# Altium PCB PCB1.PcbDoc
Units mil, origin at the board's own origin, x right, y up, seen from the top; angles counter-clockwise.
Board outline 6000 x 4000 mil, 2 copper layers (Top Layer, Bottom Layer); 46 components, 64 nets, 314 pads, 0 vias.
Unrouted connection lines stored in the file: 129.
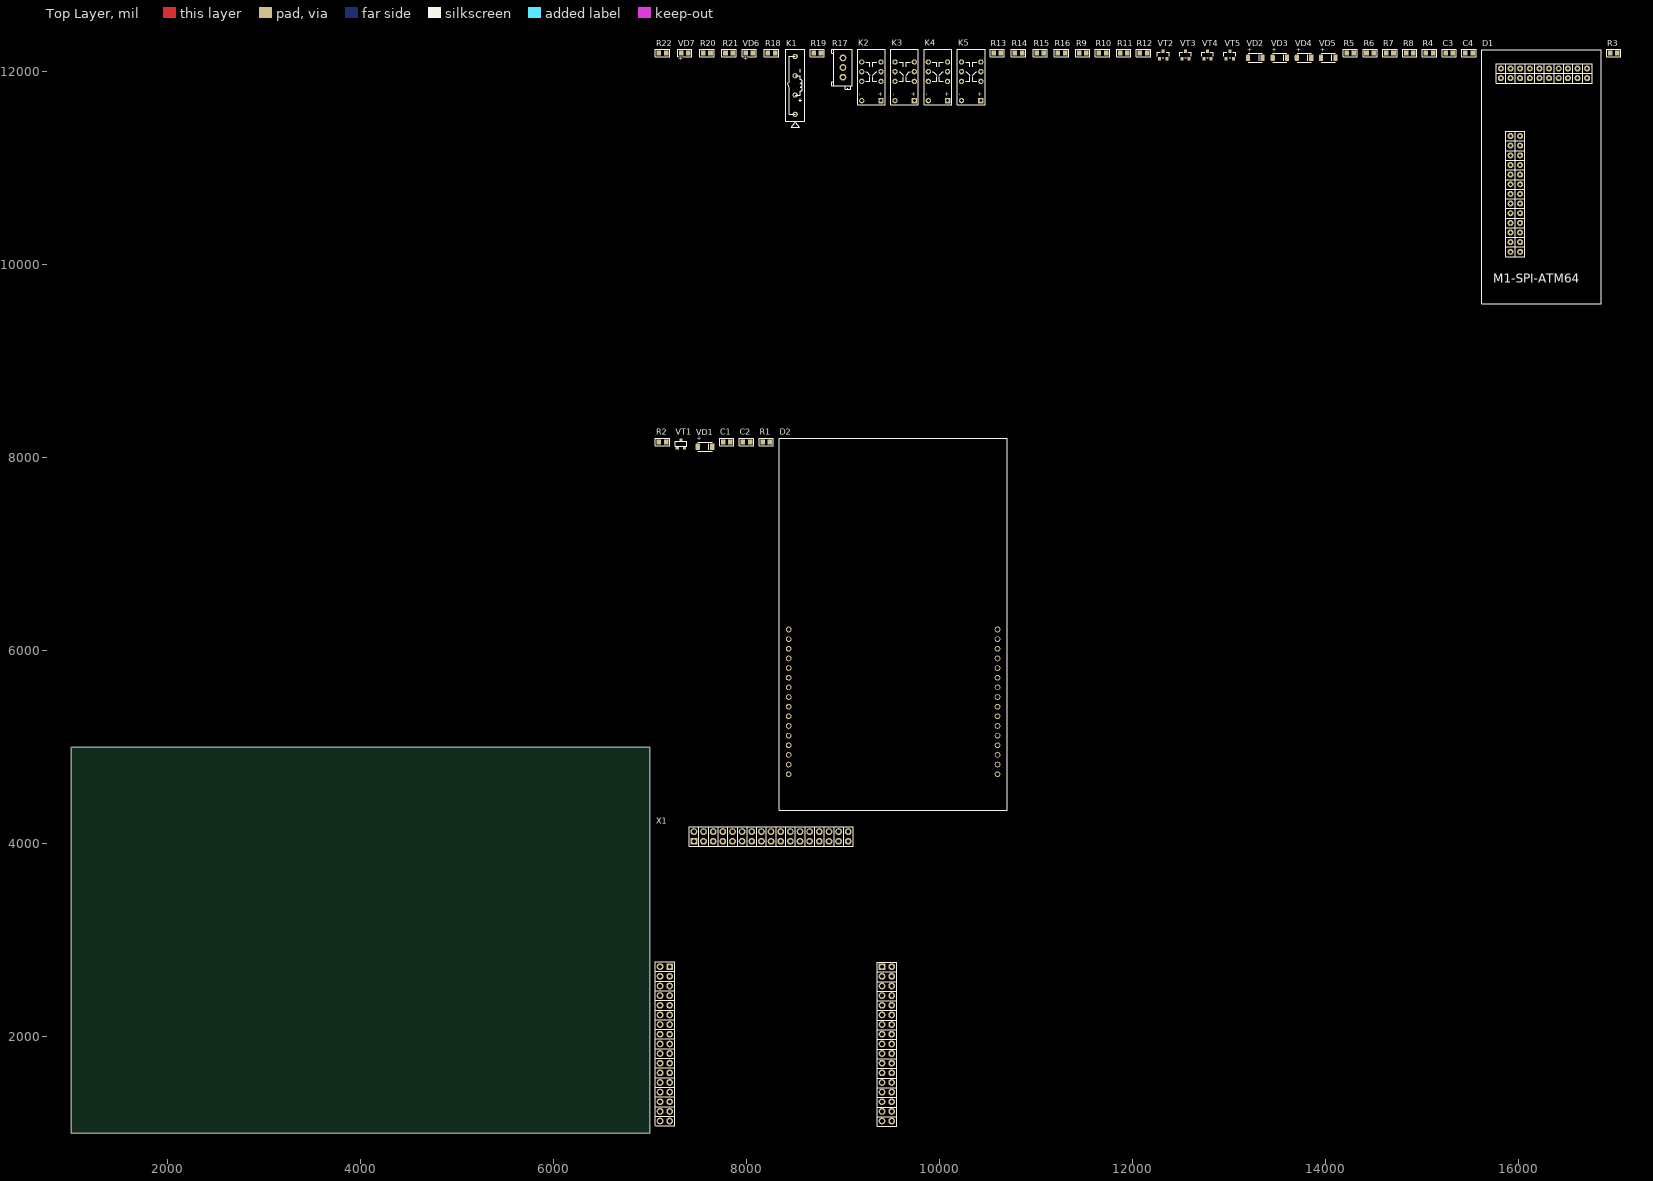
[diagram p0: Top Layer view]
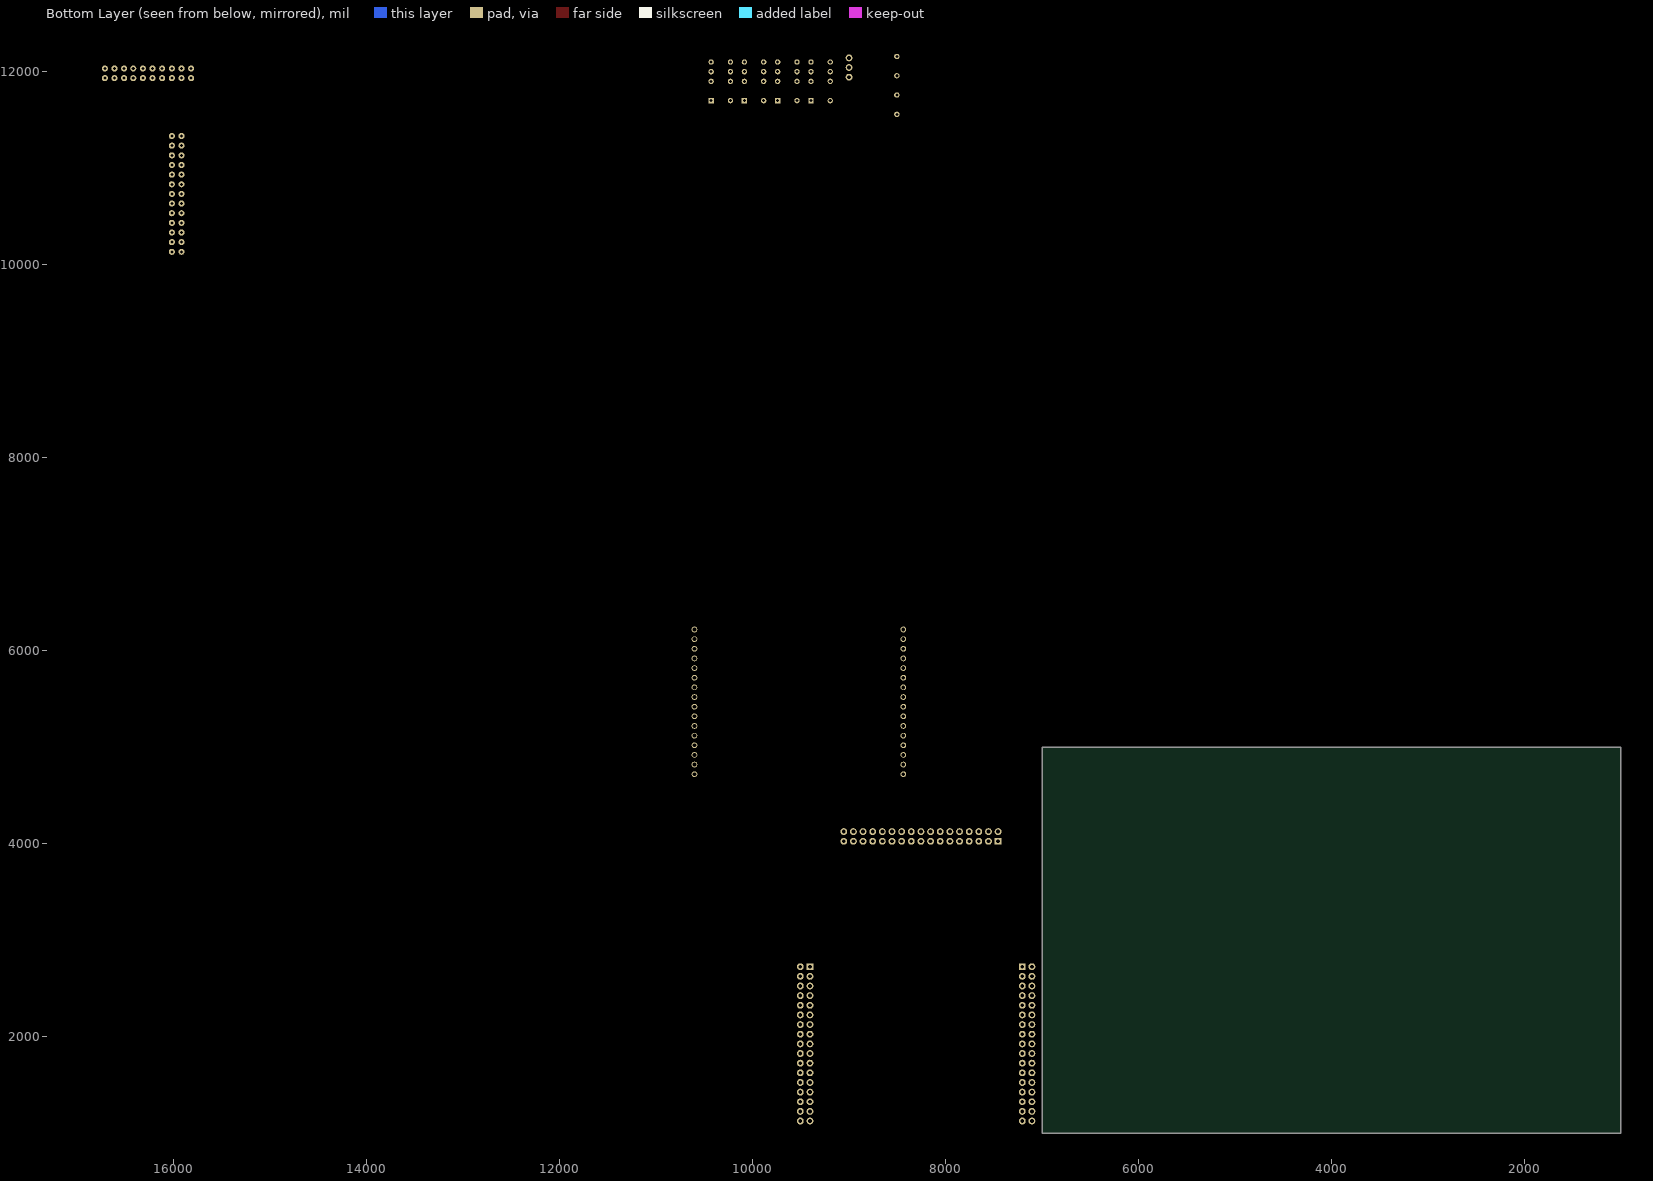
[diagram p1: Bottom Layer view, seen from below]

## Layer stack, top to bottom
Top Solder: solder mask 0.4, Solder Resist, Dk 3.5
Top Layer: signal copper 1.4
Dielectric 1: dielectric 12.6, FR-4, Dk 4.8
Bottom Layer: signal copper 1.4
Bottom Solder: solder mask 0.4, Solder Resist, Dk 3.5

## Board outline
1000,1000 7000,1000 7000,5000 1000,5000

## Design rules (kind name [scope] priority, off if disabled: settings)
Clearance [All] p1: gap=10 ignorepadtopadclearanceinfootprint=FALSE except(0: Arc-Hole Track-Hole SMDPad-Hole THPad-Hole Via-Hole Fill-Hole Poly-Hole Region-Hole Text-Hole)
PolygonConnect [All] p1: connectstyle=Relief reliefconductorwidth=10 reliefentries=4 polygonreliefangle="90 Angle" airgapwidth=10
RoutingVias [All] p1: holewidth=28 width=50 viastyle="Through Hole" minholewidth=28 minwidth=50 maxholewidth=28 maxwidth=50
SolderMaskExpansion [All] p1: expansion=4 istentingtop=FALSE
Width [All] p1: maxlimit=10 minlimit=10 preferedwidth=10
30 further rules are at their usual default settings.

## Classes and differential pairs
net class X1_Nets: +5V_CONST +5V_VCC +5V_VDD DB0_F DB1_F DB2_F DB3_F DB4_F DB5_F DB6_F DB7_F DI1_MC DO1_MC DO2_MC GND NetX1_9 NetX1_10 NetX1_11 NetX1_12 NetX1_13 NetX1_14 NetX1_15 NetX1_16 NetX1_17 NetX1_18 NetX1_19 NetX1_20 NetX1_21 NetX1_22 NetX1_23 NetX1_24 NetX1_25 NetX1_26 NetX1_27 NetX1_28 NetX1_29 NetX1_30 NetX1_31 NetX1_32 NetX1_33 NetX1_34 NetX1_35 NetX1_36 NetX1_37 NetX1_38 NetX1_39 NetX1_40 NetX1_41 NetX1_42 NetX1_43 NetX1_44 NetX1_45 NetX1_46 NetX1_47 NetX1_48 NetX1_49 NetX1_50 NetX1_51 NetX1_52 NetX1_53 NetX1_54 NetX1_55 NetX1_56 NetX1_57 NetX1_58 NetX1_59 NetX1_60 NetX1_61 NetX1_62 NetX1_63 NetX1_64 NetX1_+12V NetX1_-12V NetX1_GND NetX1_IN-OUT2 NetX1_IN-OUT3 NetX1_IN-OUT4 NetX1_IN-OUT5 NetX1_IN-OUT6 NetX1_IN-OUT7 NetX1_IN-OUT8 NetX1_NC NetX1_OUT4 NetX1_OUT5 NetX1_OUT6 NetX1_OUT7 NetX1_OUT8 NetX1_VDDF NetX1_VDDS NetX1_VEEF NetX1_VEES RST_IN
net class VT5_Nets: GND NetK5_12 NetR12_2
net class VT4_Nets: GND NetK4_12 NetR11_2
net class VT3_Nets: GND NetK3_12 NetR10_2
net class VT2_Nets: GND NetK2_12 NetR9_2
net class VT1_Nets: NetK1_5 NetR2_2 NetR4_2
net class VD7_Nets: GND NetR20_2
net class VD6_Nets: GND NetR18_2
net class VD5_Nets: NetK5_1 NetK5_12
net class VD4_Nets: NetK4_1 NetK4_12
net class VD3_Nets: NetK3_1 NetK3_12
net class VD2_Nets: NetK2_1 NetK2_12
net class VD1_Nets: +5V_CONST NetK1_5
net class R22_Nets: DO1_MC GND
net class R21_Nets: DO2_MC GND
net class R20_Nets: LED2 NetR20_2
net class R19_Nets: RST_IN RST_MC
net class R18_Nets: LED1 NetR18_2
net class R17_Nets: GND NetK1_1
net class R16_Nets: GND NetR12_2
net class R15_Nets: GND NetR11_2
net class R14_Nets: GND NetR10_2
net class R13_Nets: GND NetR9_2
net class R12_Nets: NetR12_2 ON_RELE4
net class R11_Nets: NetR11_2 ON_RELE3
net class R10_Nets: NetR10_2 ON_RELE2
net class R9_Nets: NetR9_2 ON_RELE1
net class R8_Nets: +5V_CONST NetK5_1
net class R7_Nets: +5V_CONST NetK4_1
net class R6_Nets: +5V_CONST NetK3_1
net class R5_Nets: +5V_CONST NetK2_1
net class R4_Nets: GND NetR4_2
net class R3_Nets: +5V_VDD VDD_MC
net class R2_Nets: NetR2_2 ON_RELE5
net class R1_Nets: +5V_VCC VCC_MT
net class K5_Nets: DB6 DB6_F DB6_MC DB7 DB7_F DB7_MC NetK5_1 NetK5_12
net class K4_Nets: DB4 DB4_F DB4_MC DB5 DB5_F DB5_MC NetK4_1 NetK4_12
net class K3_Nets: DB2 DB2_F DB2_MC DB3 DB3_F DB3_MC NetK3_1 NetK3_12
net class K2_Nets: DB0 DB0_F DB0_MC DB1 DB1_F DB1_MC NetK2_1 NetK2_12
net class K1_Nets: +5V_CONST NetK1_1 NetK1_5 U0
net class D2_Nets: +5V_VDD A0 DB0 DB1 DB2 DB3 DB4 DB5 DB6 DB7 ENABLE GND NetD2_17 NetD2_18 NetD2_19 NetD2_20 NetD2_21 NetD2_22 NetD2_23 NetD2_24 NetD2_25 NetD2_26 NetD2_27 NetD2_28 NetD2_29 NetD2_30 NetD2_31 R/W U0 VCC_MT
net class D1_Nets: A0 DB0_MC DB1_MC DB2_MC DB3_MC DB4_MC DB5_MC DB6_MC DB7_MC DI1_MC DO1_MC DO2_MC ENABLE GND LED1 LED2 NetD1_1 NetD1_2 NetD1_4 NetD1_5 NetD1_6 NetD1_9 NetD1_10 NetD1_11 NetD1_12 NetD1_14 NetD1_16 NetD1_18 NetD1_21 NetD1_22 NetD1_23 NetD1_24 ON_RELE1 ON_RELE2 ON_RELE3 ON_RELE4 ON_RELE5 R/W RST_MC VDD_MC
net class C4_Nets: GND VDD_MC
net class C3_Nets: GND VDD_MC
net class C2_Nets: GND VCC_MT
net class C1_Nets: GND VCC_MT
component class "Formula connector": X1

## Components (designator, comment, footprint, x,y, rotation, side; value= is the part's Value field where it differs from the comment)
C1 "47uF" 0805 7795,8165 r0 top
C2 "0.1uF" 0805 8000,8165 r0 top
C3 "10uF" 0805 15285,12195 r0 top
C4 "0.1uF" 0805 15490,12195 r0 top
D1 "M1-SPI-ATM64" M1-SPI-ATM64 15920,11935 r0 top
D2 "MT-20S4A" MT-20S4A 9520,6275 r90 top
K1 "TRR1A05F00" TRR1A05F00 8505,11860 r90 top
K2 "V23079A1001B301 TE" V23079A1001B301 9295,11950 r90 top
K3 "V23079A1001B301 TE" V23079A1001B301 9640,11950 r90 top
K4 "V23079A1001B301 TE" V23079A1001B301 9985,11950 r90 top
K5 "V23079A1001B301 TE" V23079A1001B301 10330,11950 r90 top
R1 "0" 0805 8205,8165 r0 top
R2 "33k" 0805 7130,8165 r0 top
R3 "1" 0805 16990,12195 r0 top
R4 "0" 0805 15080,12195 r0 top
R5 "R0805 Yageo" 0805 14260,12195 r0 top value=10
R6 "R0805 Yageo" 0805 14465,12195 r0 top value=10
R7 "R0805 Yageo" 0805 14670,12195 r0 top value=10
R8 "R0805 Yageo" 0805 14875,12195 r0 top value=10
R9 "R0805 Yageo" 0805 11485,12195 r0 top value=4.7k
R10 "R0805 Yageo" 0805 11690,12195 r0 top value=4.7k
R11 "R0805 Yageo" 0805 11910,12195 r0 top value=4.7k
R12 "R0805 Yageo" 0805 12115,12195 r0 top value=4.7k
R13 "R0805 Yageo" 0805 10600,12195 r0 top value=20k
R14 "R0805 Yageo" 0805 10820,12195 r0 top value=20k
R15 "R0805 Yageo" 0805 11045,12195 r0 top value=20k
R16 "R0805 Yageo" 0805 11265,12195 r0 top value=20k
R17 "3296X-1-503LF" 3296X-1-503LF 9000,12045 r90 top value=10k
R18 "R0805 Yageo" 0805 8260,12195 r0 top value=2.2k
R19 "100" 0805 8735,12195 r0 top
R20 "R0805 Yageo" 0805 7590,12195 r0 top value=2.2k
R21 "10k" 0805 7820,12195 r0 top
R22 "10k" 0805 7130,12195 r0 top
VD1 "LL4148" SOD80C 7570,8115 r0 top
VD2 "LL4148 NXP" SOD80C 13275,12145 r0 top
VD3 "LL4148 NXP" SOD80C 13530,12145 r0 top
VD4 "LL4148 NXP" SOD80C 13780,12145 r0 top
VD5 "LL4148 NXP" SOD80C 14030,12145 r0 top
VD6 "LED(0805)" 0805(LED) 8030,12195 r0 top
VD7 "LED(0805)" 0805(LED) 7360,12195 r0 top
VT1 "BC817" SOT-23#1 7320,8145 r0 top
VT2 "MMBT5551L" SOT-23#2 12320,12175 r0 top
VT3 "MMBT5551L" SOT-23#2 12550,12175 r0 top
VT4 "MMBT5551L" SOT-23#2 12780,12175 r0 top
VT5 "MMBT5551L" SOT-23#2 13010,12175 r0 top
X1 "FORMULA" FORMULA 8355,2245 r90 top

## Footprints (in the part's own frame and the unit in brackets; to place one, negate y for a bottom-side part, rotate by r counter-clockwise, add the part's x,y. Pads: shape width x height; smd on the part's side, far side on the other; paste and mask are expansions set on the pad)
0805 [mm]
  rect 1.2x1.3 smd: 1(-0.95,0) 2(0.95,0)
  silkscreen extent -1.87,-0.97 1.87,0.97, body extent -1.05,-0.63 0.95,0.63, height 0.55
0805(LED) [mm]
  rect 1.2x1.3 smd: 1(-0.95,0) 2(0.95,0)
  silkscreen extent -1.87,-0.97 1.87,0.97, body extent -1.03,-0.41 1.03,0.5, height 0.85
3296X-1-503LF [mm]
  round 1.8 hole 1: 1(2.54,0) 2(0,0) 3(-2.54,0)
  silkscreen extent -5.77,-2.45 4.76,2.95, body extent -6.34,-2.45 4.74,2.38, height 9.98
FORMULA [mm]
  rect 1.8x1.8 hole 1: 1(12.18,29.22) VDDF(12.18,-26.68) VEEF(45.2,22.86)
  round 1.8 hole 1: 2(9.64,29.22) 3(7.1,29.22) 4(4.56,29.22) 5(2.02,29.22) 6(-0.52,29.22) 7(-3.06,29.22) 8(-5.6,29.22) 9(-8.14,29.22) 10(-10.68,29.22) 11(-13.22,29.22) 12(-15.76,29.22) 13(-18.3,29.22) 14(-20.84,29.22) 15(-23.38,29.22) 16(-25.92,29.22) 17(12.18,31.76) 18(9.64,31.76) 19(7.1,31.76) 20(4.56,31.76) 21(2.02,31.76) 22(-0.52,31.76) 23(-3.06,31.76) 24(-5.6,31.76) 25(-8.14,31.76) 26(-10.68,31.76) 27(-13.22,31.76) 28(-15.76,31.76) 29(-18.3,31.76) 30(-20.84,31.76) 31(-23.38,31.76) 32(-25.92,31.76) 33(-28.46,-29.22) 34(-25.92,-29.22) 35(-23.38,-29.22) 36(-20.84,-29.22) 37(-18.3,-29.22) 38(-15.76,-29.22) 39(-13.22,-29.22) 40(-10.68,-29.22) 41(-8.14,-29.22) 42(-5.6,-29.22) 43(-3.06,-29.22) 44(-0.52,-29.22) 45(2.02,-29.22) 46(4.56,-29.22) 47(7.1,-29.22) 48(9.64,-29.22) 49(-28.46,-26.68) 50(-25.92,-26.68) 51(-23.38,-26.68) 52(-20.84,-26.68) 53(-18.3,-26.68) 54(-15.76,-26.68) 55(-13.22,-26.68) 56(-10.68,-26.68) 57(-8.14,-26.68) 58(-5.6,-26.68) 59(-3.06,-26.68) 60(-0.52,-26.68) 61(2.02,-26.68) 62(4.56,-26.68) 63(7.1,-26.68) 64(9.64,-26.68) +5V(45.2,-15.24) +5V(47.74,-15.24) +5V_VCCF(45.2,20.32) +5V_VCCS(47.74,20.32) +5V_VDDF(45.2,17.78) +5V_VDDS(47.74,17.78) +12V(45.2,-12.7) +12V(47.74,-12.7) -12V(45.2,-17.78) -12V(47.74,-17.78) GND(-28.46,29.22) GND(-28.46,31.76) GND(45.2,-10.16) GND(45.2,15.24) GND(47.74,-10.16) GND(47.74,15.24) IN-OUT1(47.74,10.16) IN-OUT2(47.74,7.62) IN-OUT3(47.74,5.08) IN-OUT4(47.74,2.54) IN-OUT5(47.74,0) IN-OUT6(47.74,-2.54) IN-OUT7(47.74,-5.08) IN-OUT8(47.74,-7.62) NC(45.2,12.7) NC(47.74,12.7) OUT1(45.2,10.16) OUT2(45.2,7.62) OUT3(45.2,5.08) OUT4(45.2,2.54) OUT5(45.2,0) OUT6(45.2,-2.54) OUT7(45.2,-5.08) OUT8(45.2,-7.62) VDDS(12.18,-29.22) VEES(47.74,22.86)
  silkscreen extent -29.8,-30.51 49.02,32.97, body extent -29.79,-30.4 48.98,32.92, height 3
M1-SPI-ATM64 [mm]
  round 1.6 hole 0.8: 1(-2.54,2.54) 2(-2.54,0) 3(0,2.54) 4(0,0) 5(2.54,2.54) 6(2.54,0) 7(5.08,2.54) 8(5.08,0) 9(7.62,2.54) 10(7.62,0) 11(10.16,2.54) 12(10.16,0) 13(12.7,2.54) 14(12.7,0) 15(15.11,2.54) 16(15.11,0) 17(17.65,2.54) 18(17.65,0) 19(20.19,2.54) 20(20.19,0) 21(0,-15.24) 22(2.54,-15.24) 23(0,-17.78) 24(2.54,-17.78) 25(0,-20.32) 26(2.54,-20.32) 27(0,-22.86) 28(2.54,-22.86) 29(0,-25.4) 30(2.54,-25.4) 31(0,-27.94) 32(2.54,-27.94) 33(0,-30.48) 34(2.54,-30.48) 35(0,-33.02) 36(2.54,-33.02) 37(0,-35.56) 38(2.54,-35.56) 39(0,-38.1) 40(2.54,-38.1) 41(0,-40.64) 42(2.54,-40.64) 43(0,-43.18) 44(2.54,-43.18) 45(0,-45.72) 46(2.54,-45.72)
  silkscreen extent -7.54,-59.46 23.9,7.54, body extent -4.06,-47.27 21.84,3.7, height 8.5
MT-20S4A [mm]
  round 1.5 hole 1: 1(-39.5,27.5) 2(-36.96,27.5) 3(-34.42,27.5) 4(-31.88,27.5) 5(-29.34,27.5) 6(-26.8,27.5) 7(-24.26,27.5) 8(-21.72,27.5) 9(-19.18,27.5) 10(-16.64,27.5) 11(-14.1,27.5) 12(-11.56,27.5) 13(-9.02,27.5) 14(-6.48,27.5) 15(-3.94,27.5) 16(-1.4,27.5) 17(-39.5,-27.5) 18(-36.96,-27.5) 19(-34.42,-27.5) 20(-31.88,-27.5) 21(-29.34,-27.5) 22(-26.8,-27.5) 23(-24.26,-27.5) 24(-21.72,-27.5) 25(-19.18,-27.5) 26(-16.64,-27.5) 27(-14.1,-27.5) 28(-11.56,-27.5) 29(-9.02,-27.5) 30(-6.48,-27.5) 31(-3.94,-27.5) 32(-1.4,-27.5)
  round 0 hole 3.5: 2(-46.5,-27.5) 2(-46.5,27.5) 2(46.5,-27.5) 2(46.5,27.5)
  silkscreen extent -49,-30 49,30, body extent -40.43,-28.43 -0.52,28.46, height 9.6
SOD80C [mm]
  rrect50% 1.1x1.7 smd: 1(-1.9,0)
  rect 1.1x1.7 smd: 2(1.9,0)
  silkscreen extent -1.85,-1.17 1.85,1.17, body extent -1.9,-0.8 1.8,0.8, height 1.55
SOT-23#1 [mm]
  rect 0.8x0.9 smd: 1(-0.95,-1) 2(0.95,-1) 3(0,1)
  silkscreen extent -1.5,-0.7 1.5,0.7, body extent -1.5,-1.15 1.5,1.15, height 1.09
SOT-23#2 [mm]
  rect 0.8x0.9 smd: 1(-0.95,-1) 1(-0.95,-1) 2(0.95,-1) 2(0.95,-1) 3(0,1) 3(0,1)
  silkscreen extent -1.55,-0.72 1.55,0.7, body extent -1.5,-1.25 1.5,1.25, height 1.05
TRR1A05F00 [mm]
  round 1.4 hole 0.8: 1(-7.62,0) 3(-2.54,0) 5(2.54,0) 7(7.62,0)
  silkscreen extent -11,-2.5 9.5,2.5, body extent -9.47,-2.64 9.53,2.39, height 7.64
V23079A1001B301 [mm]
  rect 1.4x1.4 hole 0.8: 1(-6.3,-2.54)
  round 1.4 hole 0.8: 3(-1.22,-2.54) 4(1.32,-2.54) 5(3.86,-2.54) 8(3.86,2.54) 9(1.32,2.54) 10(-1.22,2.54) 12(-6.3,2.54)
  silkscreen extent -7.4,-3.63 7.25,3.63, body extent -7.25,-3.6 7.25,3.6, height 9.4

## Part data
C1 C2 C3 C4: library part C0805, ComponentHeigt=1.3, Firme=AVX, KIND=Конденсатор, Leadform=SMD, Packaging=0805
R1 R2 R3 R19 R21 R22: library part "R0805 Yageo", ComponentHeigt=0.6, Firme=Yageo, KIND=Резистор, Leadform=SMD, Packaging=0805
R4: library part "RC0805 Yageo", ComponentHeigt=0.6, Firme=Yageo, KIND=Резистор, Leadform=SMD, Packaging=0805
VD1: library part "BAS32L (SOD-80C)"
VT1: C-E Saturation Voltage=0.7V, C-E Voltage=45V, Collector Current=500mA, DC Current Gain=100…600, Manufacturer=NXP, Total Power Dissipation=250mW, Transition Frequency=100MHz, Working Temperature Max=+150°С, Working Temperature Min=-65°С, Application Category=1, Functional Analog=BC817-40, ID=16, Part Number=BC817, Published=07.05.2013, Publisher="Andrew Danich", Type=Транзистор
R5 R6 R7 R8 R9 R10 R11 R12 R13 R14 R15 R16 R17 R18 R20: ComponentHeigt=0.6, Firme=Yageo, KIND=Резистор, Leadform=SMD, Packaging=0805
VD2 VD3 VD4 VD5: Component Link=http://www.nxp.com, ComponentHeigt=1.6, Firme=NXP, KIND="Диод LL4148 NXP", Leadform=SMD, NN=24009301, Packaging=SOD-80C
VD6 VD7: ComponentHeigt=0.75, Firme=Kingbright, KIND="Светодиод L-1154GD Kingbright", Leadform="в отверстия", NN=24003000
VT2 VT3 VT4 VT5: ComponentHeigt=1.1, Firme=ONS, KIND="Транзистор MMBT5551L*G ONS", Leadform=SMD, NN=24007468, Packaging=SOT-23

## Nets (pads, with @x,y where several pads share a name; then routed paths per layer and width w, separated by ;. In a path a pad name is that pad's centre, name@x,y a point inside that pad or via, vN(x,y) a via of type N, cw(c..) or ccw(c..) an arc to the next point about the centre after c; other vN are vias at no path point)
+5V_CONST: K1.3 R5.1 R6.1 R7.1 R8.1 VD1.2 X1.+5V
+5V_VCC: R1.1 X1.+5V_VCCF X1.+5V_VCCS
+5V_VDD: D2.15 R3.1 X1.+5V_VDDF X1.+5V_VDDS
A0: D1.8 D2.4
DB0: D2.7 K2.4
DB0_F: K2.5 X1.1
DB0_MC: D1.26 K2.3
DB1: D2.8 K2.9
DB1_F: K2.8 X1.2
DB1_MC: D1.27 K2.10
DB2: D2.9 K3.4
DB2_F: K3.5 X1.3
DB2_MC: D1.28 K3.3
DB3: D2.10 K3.9
DB3_F: K3.8 X1.4
DB3_MC: D1.29 K3.10
DB4: D2.11 K4.4
DB4_F: K4.5 X1.5
DB4_MC: D1.30 K4.3
DB5: D2.12 K4.9
DB5_F: K4.8 X1.6
DB5_MC: D1.31 K4.10
DB6: D2.13 K5.4
DB6_F: K5.5 X1.7
DB6_MC: D1.32 K5.3
DB7: D2.14 K5.9
DB7_F: K5.8 X1.8
DB7_MC: D1.33 K5.10
DI1_MC: D1.41 X1.IN-OUT1
DO1_MC: D1.45 R22.1 X1.OUT1
DO2_MC: D1.43 R21.1 X1.OUT2
ENABLE: D1.3 D2.6
GND: C1.2 C2.2 C3.2 C4.2 D1.13 D1.15 D1.17 D1.19 D1.20 D2.1 D2.16 D2.32 R4.1 R13.2 R14.2 R15.2 R16.2 R17.2 R17.3 R21.2 R22.2 VD6.2 VD7.2 VT2.2 VT3.2 VT4.2 VT5.2 X1.GND
LED1: D1.38 R18.1
LED2: D1.40 R20.1
NetK1_1: K1.1 R17.1
NetK1_5: K1.5 VD1.1 VT1.2
NetK2_1: K2.1 R5.2 VD2.2
NetK2_12: K2.12 VD2.1 VT2.3
NetK3_1: K3.1 R6.2 VD3.2
NetK3_12: K3.12 VD3.1 VT3.3
NetK4_1: K4.1 R7.2 VD4.2
NetK4_12: K4.12 VD4.1 VT4.3
NetK5_1: K5.1 R8.2 VD5.2
NetK5_12: K5.12 VD5.1 VT5.3
NetR2_2: R2.2 VT1.1
NetR4_2: R4.2 VT1.3
NetR9_2: R9.2 R13.1 VT2.1
NetR10_2: R10.2 R14.1 VT3.1
NetR11_2: R11.2 R15.1 VT4.1
NetR12_2: R12.2 R16.1 VT5.1
NetR18_2: R18.2 VD6.1
NetR20_2: R20.2 VD7.1
ON_RELE1: D1.39 R9.1
ON_RELE2: D1.37 R10.1
ON_RELE3: D1.35 R11.1
ON_RELE4: D1.36 R12.1
ON_RELE5: D1.34 R2.1
R/W: D1.7 D2.5
RST_IN: R19.1 X1.OUT3
RST_MC: D1.25 R19.2
U0: D2.3 K1.7
VCC_MT: C1.1 C2.1 D2.2 R1.2
VDD_MC: C3.1 C4.1 D1.42 D1.44 D1.46 R3.2
pads on no net: D1.1 D1.2 D1.4 D1.5 D1.6 D1.9 D1.10 D1.11 D1.12 D1.14 D1.16 D1.18 D1.21 D1.22 D1.23 D1.24 D2.17 D2.18 D2.19 D2.20 D2.21 D2.22 D2.23 D2.24 D2.25 D2.26 D2.27 D2.28 D2.29 D2.30 D2.31 X1.9 X1.10 X1.11 X1.12 X1.13 X1.14 X1.15 X1.16 X1.17 X1.18 X1.19 X1.20 X1.21 X1.22 X1.23 X1.24 X1.25 X1.26 X1.27 X1.28 X1.29 X1.30 X1.31 X1.32 X1.33 X1.34 X1.35 X1.36 X1.37 X1.38 X1.39 X1.40 X1.41 X1.42 X1.43 X1.44 X1.45 X1.46 X1.47 X1.48 X1.49 X1.50 X1.51 X1.52 X1.53 X1.54 X1.55 X1.56 X1.57 X1.58 X1.59 X1.60 X1.61 X1.62 X1.63 X1.64 X1.+12V X1.-12V X1.IN-OUT2 X1.IN-OUT3 X1.IN-OUT4 X1.IN-OUT5 X1.IN-OUT6 X1.IN-OUT7 X1.IN-OUT8 X1.NC X1.OUT4 X1.OUT5 X1.OUT6 X1.OUT7 X1.OUT8 X1.VDDF X1.VDDS X1.VEEF X1.VEES

## Text inside footprints (layer, text, board x,y; h text height)
K2: Top Overlay "+" at 9420.98,11744.49 h78.74 r90; Top Overlay "-" at 9211.93,11750.39 h78.74 r90
K3: Top Overlay "+" at 9765.98,11744.49 h78.74 r90; Top Overlay "-" at 9556.93,11750.39 h78.74 r90
K4: Top Overlay "+" at 10110.98,11744.49 h78.74 r90; Top Overlay "-" at 9901.93,11750.39 h78.74 r90
K5: Top Overlay "+" at 10455.98,11744.49 h78.74 r90; Top Overlay "-" at 10246.93,11750.39 h78.74 r90
VD1: Top Overlay "+" at 7486.72,8164.3 h78.74
VD2: Top Overlay "+" at 13191.72,12194.3 h78.74
VD3: Top Overlay "+" at 13446.72,12194.3 h78.74
VD4: Top Overlay "+" at 13696.72,12194.3 h78.74
VD5: Top Overlay "+" at 13946.72,12194.3 h78.74
VD6: Top Overlay "+" at 7965.2,12107.06 h78.74
VD7: Top Overlay "+" at 7295.2,12107.06 h78.74